# Altium PCB Catan_board.PcbDoc (part 2 of 3)
Units mm, origin at the board's own origin, x right, y up, seen from the top; angles counter-clockwise.
Board outline 80 x 59.64 mm, 2 copper layers (Top Layer, Bottom Layer), stack 1.448 mm thick; 132 components, 59 nets, 410 pads, 538 vias.
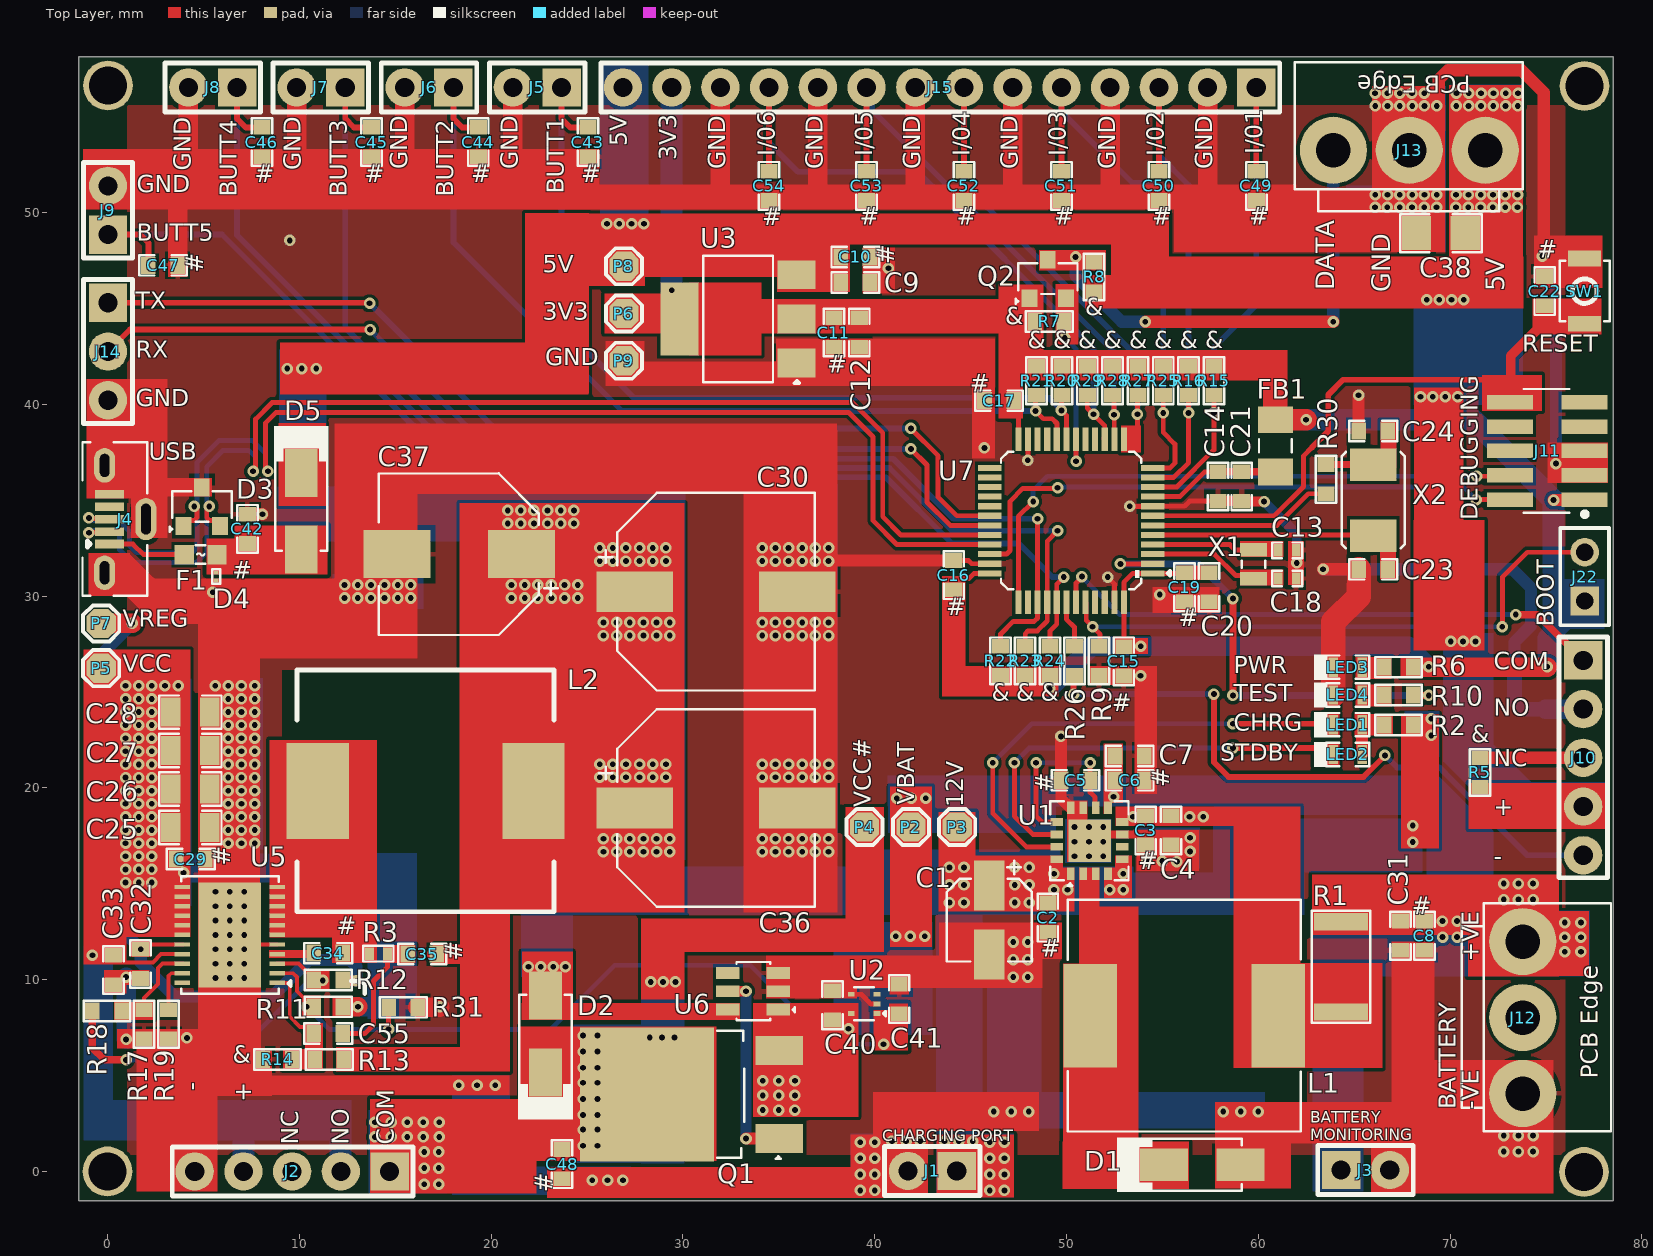
[diagram p0: Top Layer view]

## Part data (continued)
J11: "CONN HEADER SMD 10POS 1.27MM", Color=Black, Contact Resistance=30mR, Current Rating=1A, Insulation Resistance=100MR, LCSC Part Number=C150517, Manufacturer="Amphenol FCI", Max Operating Temperature=85°C, Max Voltage Rating (AC)=125V, Min Operating Temperature=-40°C, Package Quantity=600, Supplier Part Number 1=609-3695-6-ND, ComponentLink1Description=https://www.verical.com/server-webapp/html/getDatasheet?partID=177140&src-supplier=Verical, ComponentLink1URL=https://www.verical.com/server-webapp/html/getDatasheet?partID=177140&src-supplier=Verical, ComponentLink2Description=http://portal.fciconnect.com/Comergent/fci/drawing/20021121.pdf?src-supplier=Avnet, ComponentLink2URL=http://portal.fciconnect.com/Comergent/fci/drawing/20021121.pdf?src-supplier=Avnet, ComponentLink3Description=https://cdn.amphenol-icc.com/media/wysiwyg/files/drawing/20021121.pdf?src-supplier=Digi-Key, ComponentLink3URL=https://cdn.amphenol-icc.com/media/wysiwyg/files/drawing/20021121.pdf?src-supplier=Digi-Key, ComponentLink4Description=http://portal.fciconnect.com/Comergent/fci/drawing/20021121.pdf?src-supplier=Avnet+Europe, ComponentLink4URL=http://portal.fciconnect.com/Comergent/fci/drawing/20021121.pdf?src-supplier=Avnet+Europe, ComponentLink5Description=https://media.digikey.com/pdf/Data%20Sheets/FCI%20PDFs/Minitek%20127_Catalog.pdf?src-supplier=Digi-Key, ComponentLink5URL=https://media.digikey.com/pdf/Data%20Sheets/FCI%20PDFs/Minitek%20127_Catalog.pdf?src-supplier=Digi-Key, ComponentLink6Description=http://portal.fciconnect.com/Comergent//fci/drawing/20021121.pdf?src-supplier=Mouser, ComponentLink6URL=http://portal.fciconnect.com/Comergent//fci/drawing/20021121.pdf?src-supplier=Mouser, Connector Type="Male Pin,Header", Contact Material="Copper Alloy,Copper,Gold", Contact Mating Length=0.12inch, Contact Plating=Gold, Depth=3.4mm, Gender=Male, Housing Color=Black, Housing Material=Thermoplastic, Item Type="Jtag Header", Length=6.35mm, Manufacturer Part Number=20021121-00010C4LF, Mount="Surface Mount", Number of Contacts=10, Number of Positions=10, Number of Rows=2, Orientation=Straight, Packaging="Tape and Reel", Pitch=1.27mm, Pricing 1="1=0.87, 10=0.761, 100=0.6563 (USD)", Radiation Hardening=No, REACH SVHC="No SVHC", Row Spacing=0.05inch, Stack Height=3mm, Stock 1=0, Supplier 1=Digi-Key, Termination=Solder, Voltage Rating=125V
J12: library part B3P-VH(LF)(SN), "1x3P VH 1 3.96mm 3 Brass Plugin,P=3.96mm Wire To Board / Wire To Wire Connector ROHS", LCSC Part Number=C160316, Manufacture="JST Sales America", ComponentLink1Description=LCSC, ComponentLink1URL=https://www.lcsc.com/product-detail/Wire-To-Board-Wire-To-Wire-Connector_JST-Sales-America-B3P-VH-LF-SN_C160316.html, Item Type=Connector, Manufacture part number=B3P-VH(LF)(SN), Pakage=Plugin,P=3.96mm
J13: "1x3P VH 1 3.96mm 3 Brass Plugin,P=3.96mm Wire To Board / Wire To Wire Connector ROHS", LCSC Part Number=C160316, Manufacture="JST Sales America", ComponentLink1Description=LCSC, ComponentLink1URL=https://www.lcsc.com/product-detail/Wire-To-Board-Wire-To-Wire-Connector_JST-Sales-America-B3P-VH-LF-SN_C160316.html, Item Type=Connector, Manufacture part number=B3P-VH(LF)(SN), Pakage=Plugin,P=3.96mm
J14: library part "3P Through Hole Pads", "Wire Connecting Pads", Item Type="Through Hole Pads", Manufacturer Part Number="3P Through Hole Pads"
J15: library part "14P Through Hole Pads", "Wire Connecting Pads", Item Type="Through Hole Pads", Manufacturer Part Number="14P Through Hole Pads"
J22: "KK 254 Breakaway Header, Vertical, 2 Circuits, Tin (Sn) Plating, Mating Pin Length 6.09mm", Color=Black, Contact Resistance=20mR, Current Rating=4A, Flammability Rating="UL94 V-0", LCSC Part Number=C234182, Manufacturer=Molex, Manufacturer Part Number=22-28-4020, Max Operating Temperature=75°C, Max Voltage Rating (AC)=250V, Min Operating Temperature=0°C, Package Quantity=1, Supplier Part Number 1=8967620, Category="Headers and Wire Housings", ComponentLink1Description=https://datasheet.ciiva.com/1433/1596842-1433683.pdf?src-supplier=Element14, ComponentLink1URL=https://datasheet.ciiva.com/1433/1596842-1433683.pdf?src-supplier=Element14, ComponentLink2Description=https://datasheet.ciiva.com/5157/0022284020-pcb-headers-228358-5157523.pdf?src-supplier=Mouser, ComponentLink2URL=https://datasheet.ciiva.com/5157/0022284020-pcb-headers-228358-5157523.pdf?src-supplier=Mouser, ComponentLink3Description=https://datasheet.ciiva.com/30153/214440022284020-pcb-headers-30153261.pdf?src-supplier=Onlinecomponents.com, ComponentLink3URL=https://datasheet.ciiva.com/30153/214440022284020-pcb-headers-30153261.pdf?src-supplier=Onlinecomponents.com, ComponentLink4Description=https://datasheet.ciiva.com/15217/getdatasheetpartid-127875-15217702.pdf?src-supplier=Verical, ComponentLink4URL=https://datasheet.ciiva.com/15217/getdatasheetpartid-127875-15217702.pdf?src-supplier=Verical, ComponentLink5Description=https://datasheet.ciiva.com/10088/0022284020-pcb-headers-10088332.pdf?src-supplier=Avnet, ComponentLink5URL=https://datasheet.ciiva.com/10088/0022284020-pcb-headers-10088332.pdf?src-supplier=Avnet, Connector Type="Male Pin", Contact Material=Brass,Bronze, Contact Mating Length=0.24inch, Contact Plating=Tin, Contact Type="Male Pin", Depth=2.49mm, Gender=Male, Glow Wire Compliant=Non-compliant, Housing Color=Black, Housing Material=Nylon, Item Type=Header, Lead Free="Lead Free", Max Voltage Rating (DC)=250V, Mount="Through Hole", Number of Circuits=2, Number of Contacts=2, Number of Positions=2, Number of Rows=1, Orientation=Straight, Packaging=Bulk, Pitch=2.54mm, Pricing 1="50=0.06100, 150=0.05600, 250=0.05200, 500=0.04900 (GBP)", Radiation Hardening=No, RoHS=Yes, RoHS Compliant=Yes, Series="KK® 42375", Stock 1=29550, Supplier 1=Rs, Termination=Solder, Voltage Rating=250V, Voltage Rating (DC)=250V
L1: library part YPRH1204-220M, "2.9A 22uH ±20% 66mΩ SMD,12x12x5mm Power Inductors ROHS", LCSC Part Number=C338845, Manufacturer=YJYCOIN, Package=SMD,12x12x5mm, ComponentLink1Description=LCSC, ComponentLink1URL=https://www.lcsc.com/product-detail/Power-Inductors_YJYCOIN-YPRH1204-220M_C338845.html, Item Type=Inductor, Manufacturer Part Number=YPRH1204-220M
L2: library part BCIH1367-2R2M, "22A 2.2uH ±20% SMD Power Inductors ROHS", LCSC Part Number=C237973, Manufacturer="BC(Bao Cheng Elec)", Package=SMD, ComponentLink1Description=LCSC, ComponentLink1URL=https://www.lcsc.com/product-detail/Power-Inductors_BC-Bao-Cheng-Elec-BCIH1367-2R2M_C237973.html, Item Type=Inductor, Manufacturer Part Number=BCIH1367-2R2M
LED1: library part NCD0603G2, "Emerald 0603 Light Emitting Diodes (LED) ROHS", LCSC Part Number=C87326, Manufacturer="Foshan NationStar Optoelectronics", Package=0603, ComponentLink1Description=LCSC, ComponentLink1URL=https://www.lcsc.com/product-detail/Light-Emitting-Diodes-LED_Foshan-NationStar-Optoelectronics-NCD0603G2_C87326.html, Item Type=LED, Manufacturer Part Number=NCD0603G2
LED2 LED3 LED4: library part NCD0603R3, "0603 Light Emitting Diodes (LED) ROHS", LCSC Part Number=C3151730, Manufacturer="Foshan NationStar Optoelectronics", Package=0603, ComponentLink1Description=LCSC, ComponentLink1URL=https://www.lcsc.com/product-detail/Light-Emitting-Diodes-LED_Foshan-NationStar-Optoelectronics-NCD0603R3_C3151730.html, Item Type=LED, Manufacturer Part Number=NCD0603R3
P2 P3 P4 P5 P6 P7 P8 P9: "Test Point ON"
Q1: "30V 20A 29W 39mΩ@10V,15A 2.5V@250uA P Channel 1345pF@15V TO-252-2L MOSFETs ROHS", LCSC Part Number=C4748750, Manufacturer="HXY MOSFET", Package=TO-252-2L, ComponentLink1Description=LCSC, ComponentLink1URL=https://www.lcsc.com/product-detail/MOSFETs_HXY-MOSFET-20P03-HXY_C4748750.html, Item Type=Mosfet, Manufacturer Part Number=20P03-HXY
Q2: "50V 220mA 3.5Ω@10V,220mA 225mW 1.6V@1mA N Channel SOT-23 MOSFETs ROHS", LCSC Part Number=C426569, Manufacturer="Slkor(SLKORMICRO Elec.)", Package=SOT-23, ComponentLink1Description=LCSC, ComponentLink1URL=https://www.lcsc.com/product-detail/MOSFETs_Slkor-SLKORMICRO-Elec-BSS138_C426569.html, Item Type=Mosfet, Manufacturer Part Number=BSS138
R1: library part WSL2010R0500FEA, "RES 0.05 OHM 1% 1/2W 2010", Case Code (Imperial)=2010, Case Code (Metric)=5025, LCSC Part Number=C844689, Manufacturer="Vishay Dale", Max Operating Temperature=170°C, Max Power Dissipation=500mW, Min Operating Temperature=-65°C, Package Quantity=1, Resistance=50mR, Resistor Type="Metal Element,Metal Strip", Supplier Part Number 1=WSLE-.05CT-ND, Temperature Coefficient=75ppm/°C, Tolerance=1%, Voltage Rating=150mV, Case/Package=2010, Category="Chip SMD Resistors", ComponentLink1Description=https://datasheet.ciiva.com/2483/wsl-2483729.pdf?src-supplier=Digi-Key, ComponentLink1URL=https://datasheet.ciiva.com/2483/wsl-2483729.pdf?src-supplier=Digi-Key, ComponentLink2Description=https://datasheet.ciiva.com/2483/wsl-2483730.pdf?src-supplier=Digi-Key, ComponentLink2URL=https://datasheet.ciiva.com/2483/wsl-2483730.pdf?src-supplier=Digi-Key, ComponentLink3Description=https://datasheet.ciiva.com/2483/wsl-2483731.pdf?src-supplier=Digi-Key, ComponentLink3URL=https://datasheet.ciiva.com/2483/wsl-2483731.pdf?src-supplier=Digi-Key, ComponentLink4Description=https://datasheet.ciiva.com/7695/wsl-7695158.pdf?src-supplier=Element14, ComponentLink4URL=https://datasheet.ciiva.com/7695/wsl-7695158.pdf?src-supplier=Element14, ComponentLink5Description=https://datasheet.ciiva.com/16215/wsl-16215947.pdf?src-supplier=Future+Electronics, ComponentLink5URL=https://datasheet.ciiva.com/16215/wsl-16215947.pdf?src-supplier=Future+Electronics, ComponentLink6Description=https://datasheet.ciiva.com/17177/wsl-17177243.pdf?src-supplier=Avnet+Europe, ComponentLink6URL=https://datasheet.ciiva.com/17177/wsl-17177243.pdf?src-supplier=Avnet+Europe, ComponentLink7Description=https://datasheet.ciiva.com/28621/1911169-28621837.pdf?src-supplier=Element14, ComponentLink7URL=https://datasheet.ciiva.com/28621/1911169-28621837.pdf?src-supplier=Element14, ComponentLink8Description=https://datasheet.ciiva.com/36857/442550-36857725.pdf?src-supplier=Element14, ComponentLink8URL=https://datasheet.ciiva.com/36857/442550-36857725.pdf?src-supplier=Element14, Contact Plating=Tin,Matte, Depth=2.54mm, Features="Moisture Resistant", Height=0.635mm, Item Type=Resistor, Lead Free="Lead Free", Length=5.08mm, Manufacturer Part Number=WSL2010R0500FEA, Military Standard=Not, Mount="Surface Mount", Number of Pins=2, Number of Terminations=2, Packaging="Tape and Reel", Power Rating=500mW, Pricing 1="1=0.92000, 10=0.81400, 25=0.74800, 50=0.68240, 100=0.59060, 250=0.49876, 500=0.42000, 1000=0.35000 (USD)", Radiation Hardening=No, REACH SVHC="No SVHC", RoHS=No, Stock 1=20000, Supplier 1=Digi-Key, Termination=SMD/SMT, Weight=0.001372oz, Width=0.1inch
R2 R6 R10: library part RT0603DRD071KL, "RES SMD 1K OHM 0.5% 1/10W 0603", Case Code (Imperial)=0603, Case Code (Metric)=1608, LCSC Part Number=C165964, Manufacturer=Yageo, Max Operating Temperature=125°C, Min Operating Temperature=-55°C, Power Rating=100mW, Resistance=1kR, Supplier Part Number 1=311-1.0KDDKR-ND, Temperature Coefficient=25ppm/°C, Tolerance=0.5%, Voltage Rating=75V, Voltage Rating (DC)=50V, Case/Package=0603, ComponentLink1Description=http://www.mouser.com/ds/2/447/yageodocoutput-1125656.pdf?src-supplier=Mouser, ComponentLink1URL=http://www.mouser.com/ds/2/447/yageodocoutput-1125656.pdf?src-supplier=Mouser, ComponentLink2Description=http://www.yageo.com/documents/recent/PYu-RT_1-to-0.05_RoHS_L_6.pdf?src-supplier=Avnet, ComponentLink2URL=http://www.yageo.com/documents/recent/PYu-RT_1-to-0.05_RoHS_L_6.pdf?src-supplier=Avnet, Composition="Thin Film", Contact Plating=Tin,Matte, Lead Free="Lead Free", Manufacturer Part Number=RT0603DRD071KL, Packaging="Tape and Reel", Pricing 1="1=0.2, 10=0.167, 100=0.0651, 1000=0.02725, 2500=0.02498 (USD)", Radiation Hardening=No, Stock 1=178947, Supplier 1=Digi-Key, Termination=SMD/SMT
R3: library part WR04X1541FTL, "62.5mW Thick Film Resistors ±1% 1.54kΩ 0402 Chip Resistor - Surface Mount ROHS", LCSC Part Number=C396136, Manufacturer="Walsin Tech Corp", Package=0402, ComponentLink1Description=LCSC, ComponentLink1URL=https://www.lcsc.com/product-detail/Chip-Resistor-Surface-Mount_Walsin-Tech-Corp-WR04X1541FTL_C396136.html, Item Type=Resistor, Manufacturer Part Number=WR04X1541FTL
R5 R7 R8 R14 R15 R16 R20 R21 R22 R23 R24 R25 R27 R28 R29: library part AC0603JR-0710KL, "RES SMD 10K OHM 5% 1/10W 0603", Case Code (Imperial)=0603, Case Code (Metric)=1608, LCSC Part Number=C140867, Manufacturer=Yageo, Max Operating Temperature=155°C, Max Power Dissipation=100mW, Min Operating Temperature=-55°C, Package Quantity=1, Resistance=10kR, Resistor Type="Thick Film", Supplier Part Number 1=1029044, Temperature Coefficient=100ppm/°C, Tolerance=5%, Voltage Rating=50V, Case/Package=0603, Category="Chip SMD Resistors", ComponentLink1Description=https://datasheet.ciiva.com/5562/pyu-ac-51-rohs-l-2-5562553.pdf?src-supplier=Mouser, ComponentLink1URL=https://datasheet.ciiva.com/5562/pyu-ac-51-rohs-l-2-5562553.pdf?src-supplier=Mouser, Construction=Rectangular, Depth=0.8mm, Features="Moisture Resistant,Automotive AEC-Q200,Anti-Sulfur", Height=0.022inch, Item Type=Resistor, Lead Free="Lead Free", Length=0.063inch, Manufacturer Part Number=AC0603JR-0710KL, Military Standard=Not, Number of Terminations=2, Packaging="Tape and Reel", Power Rating=100mW, Pricing 1="5000=0.00540 (USD)", RoHS=Yes, RoHS Compliant=Yes, Series=AC, Size Code=0603, Stock 1=1533000, Supplier 1="Future Electronics", Termination=SMD/SMT, Width=0.031inch
R9: library part RT0603BRD0733KL, "RES SMD 33K OHM 0.1% 1/10W 0603", Case Code (Imperial)=0603, Case Code (Metric)=1608, LCSC Part Number=C705768, Manufacturer=Yageo, Max Operating Temperature=125°C, Max Power Dissipation=100mW, Min Operating Temperature=-55°C, Package Quantity=5000, Resistance=33kR, Resistor Type="Thin Film", Temperature Coefficient=25ppm/°C, Voltage Rating=75V, Voltage Rating (DC)=50V, Case/Package=0603, Category="Chip SMD Resistors", ComponentLink1Description=https://datasheet.ciiva.com/2585/pyu-rt-1-to-0-05-rohs-l-4-2585891.pdf?src-supplier=Digi-Key, ComponentLink1URL=https://datasheet.ciiva.com/2585/pyu-rt-1-to-0-05-rohs-l-4-2585891.pdf?src-supplier=Digi-Key, ComponentLink2Description=https://datasheet.ciiva.com/12810/pyu-rt-1-to-0-05-rohs-l-4-12810117.pdf?src-supplier=Mouser, ComponentLink2URL=https://datasheet.ciiva.com/12810/pyu-rt-1-to-0-05-rohs-l-4-12810117.pdf?src-supplier=Mouser, ComponentLink3Description=https://datasheet.ciiva.com/8889/pyu-rt-1-to-0-05-rohs-l-4-8889590.pdf?src-supplier=Avnet, ComponentLink3URL=https://datasheet.ciiva.com/8889/pyu-rt-1-to-0-05-rohs-l-4-8889590.pdf?src-supplier=Avnet, Construction=Rectangular, Contact Plating=Tin,Matte, Depth=0.8mm, Features="Moisture Resistant", Height=0.022inch, Lead Free="Lead Free", Length=1.6mm, Manufacturer Part Number=RT0603BRD0733KL, Military Standard=Not, Number of Terminations=2, Packaging="Tape and Reel", Power Rating=100mW, Pricing 1="1=0.30860 (USD)", Radiation Hardening=No, RoHS=Yes, RoHS Compliant=Yes, Series=RT, Size Code=0603, Stock 1=2, Supplier 1="Arrow Electronics", Supplier Part Number 1=RT0603BRD0733KL, Termination=SMD/SMT, Weight=7.1E-05oz, Width=0.031inch
R11 R12: library part RC0603JR-07100KL, "RES 100K OHM 5% 1/10W 0603", Case Code (Imperial)=0603, Case Code (Metric)=1608, LCSC Part Number=C100048, Manufacturer=Yageo, Max Operating Temperature=155°C, Max Power Dissipation=100mW, Min Operating Temperature=-55°C, Resistance=100kR, Resistance Tolerance=5%, Resistor Type="Thick Film", Supplier Part Number 1=311-100KGRCT-ND, Temperature Coefficient=100ppm/°C, Voltage Rating=50V, Case/Package=0603, Category="Chip SMD Resistors", ComponentLink1Description=https://datasheet.ciiva.com/7746/443971-7746424.pdf?src-supplier=Element14, ComponentLink1URL=https://datasheet.ciiva.com/7746/443971-7746424.pdf?src-supplier=Element14, ComponentLink2Description=https://datasheet.ciiva.com/7983/443971-7983686.pdf?src-supplier=Element14, ComponentLink2URL=https://datasheet.ciiva.com/7983/443971-7983686.pdf?src-supplier=Element14, ComponentLink3Description=https://datasheet.ciiva.com/7746/443971-7746423.pdf?src-supplier=Element14, ComponentLink3URL=https://datasheet.ciiva.com/7746/443971-7746423.pdf?src-supplier=Element14, ComponentLink4Description=https://datasheet.ciiva.com/8887/pyu-rc0603-51-rohs-l-4-8887903.pdf?src-supplier=Avnet, ComponentLink4URL=https://datasheet.ciiva.com/8887/pyu-rc0603-51-rohs-l-4-8887903.pdf?src-supplier=Avnet, Contact Plating=Tin,Matte, Features="Moisture Resistant", Lead Free="Lead Free", Manufacturer Part Number=RC0603JR-07100KL, Number of Pins=2, Number of Terminations=2, Packaging="Tape and Reel", Power Rating=100mW, Pricing 1="1=0.10000, 10=0.02000, 100=0.00800, 1000=0.00360, 2500=0.00312 (USD)", Radiation Hardening=No, REACH SVHC="No SVHC", RoHS=Yes, RoHS Compliant=Yes, Series=RC, Size Code=0603, Stock 1=1210037, Supplier 1=Digi-Key, Termination=SMD/SMT, Tolerance=5%, Voltage Rating (DC)=50V, Width=0.8mm
R13: library part RC0603FR-0773K2L, "RES 73.2K OHM 1% 1/10W 0603", Case Code (Imperial)=0603, Case Code (Metric)=1608, LCSC Part Number=C163420, Manufacturer=Yageo, Max Operating Temperature=155°C, Max Power Dissipation=100mW, Min Operating Temperature=-55°C, Resistor Type="Thick Film", Supplier Part Number 1=8036170, Temperature Coefficient=100ppm/°C, Tolerance=1%, Voltage Rating=50V, Case/Package=0603, Category="Chip SMD Resistors", ComponentLink1Description=https://datasheet.ciiva.com/8888/pyu-rc0603-51-rohs-l-4-8888325.pdf?src-supplier=Avnet, ComponentLink1URL=https://datasheet.ciiva.com/8888/pyu-rc0603-51-rohs-l-4-8888325.pdf?src-supplier=Avnet, Construction=Rectangular, Contact Plating=Tin,Matte, Depth=0.8mm, Features="Moisture Resistant", Height=0.45mm, Item Type=Resistor, Lead Free="Lead Free", Length=1.6mm, Manufacturer Part Number=RC0603FR-0773K2L, Military Standard=Not, Number of Terminations=2, Packaging="Tape and Reel", Power Rating=100mW, Pricing 1="5000=0.00150, 75000=0.00140, 250000=0.00130, 750000=0.00130, 2500000=0.00120 (USD)", RoHS=Yes, RoHS Compliant=Yes, Series=RC, Stock 1=410000, Supplier 1="Future Electronics", Termination=SMD/SMT, Voltage Rating (DC)=50V, Width=0.8mm
R17 R18: library part RC0603FR-07200KL, "RES SMD 200K OHM 1% 1/10W 0603", LCSC Part Number=C105574, Manufacturer=Yageo, Package=0603, ComponentLink3Description=LCSC, ComponentLink3URL=https://www.lcsc.com/product-detail/Chip-Resistor-Surface-Mount_YAGEO-RC0603FR-07200KL_C105574.html, Item Type=Resistor, Manufacturer Part Number=RC0603FR-07200KL
R19: library part RT0603DRD07147KL, "RES SMD 147K OHM 0.5% 1/10W 0603", Case Code (Imperial)=0603, Case Code (Metric)=1608, LCSC Part Number=C728612, Manufacturer=Yageo, Max Operating Temperature=155°C, Max Power Dissipation=100mW, Min Operating Temperature=-55°C, Package Quantity=10, Supplier Part Number 1=603-RT0603DRD07147KL, Temperature Coefficient=25ppm/°C, Tolerance=0.5%, Voltage Rating (DC)=50V, Case/Package=0603, Category="Chip SMD Resistors", ComponentLink1Description=http://www.yageo.com/documents/recent/PYu-RT_1-to-0.01_RoHS_L_9.pdf?src-supplier=Digi-Key, ComponentLink1URL=http://www.yageo.com/documents/recent/PYu-RT_1-to-0.01_RoHS_L_9.pdf?src-supplier=Digi-Key, Height=0.45mm, Item Type=Resistor, Lead Free="Lead Free", Length=1.6mm, Manufacturer Part Number=RT0603DRD07147KL, Number of Terminations=2, Packaging="Tape and Reel", Power Rating=100mW, Pricing 1="1=0.18000, 10=0.14700, 50=0.14700, 100=0.05600, 1000=0.02400, 10000=0.01800 (USD)", RoHS=Yes, RoHS Compliant=Yes, Series=RT, Stock 1=1848, Supplier 1=Mouser, Width=0.8mm
R26: library part RT0603DRD07200RL, "RES SMD 200 OHM 0.5% 1/10W 0603", Case/Package=0603, LCSC Part Number=C700498, Manufacturer=Yageo, Power Rating=100mW, Supplier Part Number 1=311-200DCT-ND, Tolerance=0.5%, Voltage Rating (DC)=50V, Lead Free="Lead Free", Manufacturer Part Number=RT0603DRD07200RL, Packaging="Cut Tape", Pricing 1="1=0.21, 10=0.174, 100=0.0682, 1000=0.02855, 2500=0.02617 (USD)", Resistance=200R, Stock 1=19572, Supplier 1=Digi-Key
R30: library part RC0603JR-07390RL, "RES SMD 390 OHM 5% 1/10W 0603", LCSC Part Number=C137632, Manufacturer=Yageo, Package=0603, ComponentLink4Description=LCSC, ComponentLink4URL=https://www.lcsc.com/product-detail/Chip-Resistor-Surface-Mount_YAGEO-RC0603JR-07390RL_C137632.html, Item Type=Resistor, Manufacturer Part Number=RC0603JR-07390RL
R31: library part PNM0603E5002BST5, "RES SMD 50K OHM 0.1% 0.15W 0603", Case Code (Imperial)=0603, Case Code (Metric)=1608, LCSC Part Number=C2073717, Manufacturer="Vishay Dale Thin Film", Max Operating Temperature=125°C, Min Operating Temperature=-55°C, Power Rating=150mW, Resistance=50kR, Supplier Part Number 1=PNM0603-50KBDKR-ND, Temperature Coefficient=25ppm/°C, Tolerance=0.1%, Voltage Rating=75V, Case/Package=0603, ComponentLink1Description=LCSC, ComponentLink1URL=https://www.lcsc.com/product-detail/Chip-Resistor-Surface-Mount_Vishay-Intertech-PNM0603E5002BST5_C2073717.html, Composition="Thin Film", Contact Plating=Copper,Tin,Silver, Height=0.02inch, Length=0.064inch, Manufacturer Part Number=PNM0603E5002BST5, Packaging="Tape and Reel", Pricing 1="1=3.07, 10=2.743, 100=2.0299 (USD)", Radiation Hardening=No, REACH SVHC=Unknown, Stock 1=16518, Supplier 1=Digi-Key, Termination=SMD/SMT, Voltage Rating (DC)=75V, Width=0.032inch
SW1: "SWITCH TACTILE SPST-NO 0.05A 12V", Contact Current Rating=50mA, Contact Resistance=100mR, Insulation Resistance=100MR, LCSC Part Number=C231329, Manufacturer=Omron, Max Operating Temperature=70°C, Max Voltage Rating (DC)=12V, Min Operating Temperature=-25°C, Operating Force=1.5N, Package Quantity=1, Ratings="Dust Proof,IP40", Supplier Part Number 1=SW1020DKR-ND, Actuator Length=0.4mm, Actuator Type=Standard, ComponentLink1Description=http://www.farnell.com/datasheets/60838.pdf?src-supplier=Farnell, ComponentLink1URL=http://www.farnell.com/datasheets/60838.pdf?src-supplier=Farnell, ComponentLink2Description=http://www.farnell.com/datasheets/60838.pdf?src-supplier=Element14, ComponentLink2URL=http://www.farnell.com/datasheets/60838.pdf?src-supplier=Element14, ComponentLink3Description=https://omronfs.omron.com/en_US/ecb/products/pdf/en-b3u.pdf?src-supplier=Digi-Key, ComponentLink3URL=https://omronfs.omron.com/en_US/ecb/products/pdf/en-b3u.pdf?src-supplier=Digi-Key, ComponentLink4Description=http://www.omron.com/ecb/products/pdf/en-b3u.pdf?src-supplier=Digi-Key, ComponentLink4URL=http://www.omron.com/ecb/products/pdf/en-b3u.pdf?src-supplier=Digi-Key, ComponentLink5Description=https://www.distrelec.biz/Web/Downloads/he/et/B3U_eng_datasheet.pdf?mime=application%2Fpdf&src-supplier=Distrelec, ComponentLink5URL=https://www.distrelec.biz/Web/Downloads/he/et/B3U_eng_datasheet.pdf?mime=application%2Fpdf&src-supplier=Distrelec, ComponentLink6Description=http://www.onlinecomponents.com/productFiles/mf-OM/en-b3u.pdf?src-supplier=Onlinecomponents.com, ComponentLink6URL=http://www.onlinecomponents.com/productFiles/mf-OM/en-b3u.pdf?src-supplier=Onlinecomponents.com, ComponentLink7Description=https://www.verical.com/server-webapp/html/getDatasheet?partID=552554&src-supplier=Verical, ComponentLink7URL=https://www.verical.com/server-webapp/html/getDatasheet?partID=552554&src-supplier=Verical, ComponentLink8Description=http://www.farnell.com/datasheets/1685550.pdf?src-supplier=Element14, ComponentLink8URL=http://www.farnell.com/datasheets/1685550.pdf?src-supplier=Element14, ComponentLink9Description=http://www.farnell.com/datasheets/2610940.pdf?src-supplier=Farnell, ComponentLink9URL=http://www.farnell.com/datasheets/2610940.pdf?src-supplier=Farnell, ComponentLink10Description=https://www.alliedelec.com/m/d/4c8a9ef82804fc3c241a13c1e298fd73.pdf?src-supplier=Allied+Electronics, ComponentLink10URL=https://www.alliedelec.com/m/d/4c8a9ef82804fc3c241a13c1e298fd73.pdf?src-supplier=Allied+Electronics, Contact Material=Silver, Current Rating=50mA, Depth=2.5mm, Electrical Life=200000Cycles, Height=1.2mm, Illumination Type=Non-Illuminated,Illuminated, Item Type=Switch, Lead Free="Lead Free", Length=4mm, Manufacturer Part Number=B3U-1000P, Max Current Rating=50mA, Mechanical Life=200000Cycles, Mount="Surface Mount", Orientation=Straight, Packaging="Tape and Reel", Pricing 1="1=1, 10=0.961, 25=0.9064, 50=0.7976, 100=0.7251, 250=0.68888, 500=0.67074, 1000=0.52571 (USD)", REACH SVHC=Unknown, Stock 1=116454, Supplier 1=Digi-Key, Switch Function=Off-Mom, Switch Travel=0.15mm, Termination=SMD/SMT, Throw Configuration=SPST, Voltage Rating (DC)=12V, Weight=0.000776oz, Width=3mm
U1: "TQFN-16-EP(4x4) Battery Management ICs ROHS", LCSC Part Number=C379389, Manufacturer="TOPPOWER(Nanjing Extension Microelectronics)", Package=TQFN-16-EP(4x4), ComponentLink1Description=LCSC, ComponentLink1URL=https://www.lcsc.com/product-detail/Battery-Management-ICs_TOPPOWER-Nanjing-Extension-Microelectronics-TP5100_C379389.html, Item Type=IC, Manufacturer Part Number=TP5100
U2: "IC SUPERVISOR 1 CHANNEL 5VSOF", Case/Package=VSOF, LCSC Part Number=C509824, Manufacturer=Rohm, Max Operating Temperature=105°C, Max Power Dissipation=210mW, Max Reset Threshold Voltage=6.09V, Max Supply Current=1.98uA, Max Supply Voltage=10V, Min Operating Temperature=-40°C, Min Reset Threshold Voltage=5.91V, Min Supply Voltage=1.2V, Number of Voltages Monitored=1, Operating Supply Current=900nA, Package Quantity=3000, Supplier Part Number 1=BD4860FVE-CT-ND, Threshold Voltage=6V, Accuracy=1%, Category="Voltage Supervisors", ComponentLink1Description=https://datasheet.ciiva.com/1974/bd48xxg-e-1974994.pdf?src-supplier=Digi-Key, ComponentLink1URL=https://datasheet.ciiva.com/1974/bd48xxg-e-1974994.pdf?src-supplier=Digi-Key, ComponentLink2Description=https://datasheet.ciiva.com/8133/bd48xxg-e-8133113.pdf?src-supplier=Avnet, ComponentLink2URL=https://datasheet.ciiva.com/8133/bd48xxg-e-8133113.pdf?src-supplier=Avnet, Item Type=IC, Lead Free="Lead Free", Manufacturer Part Number=BD4860FVE-TR, Mounting Technology="Surface Mount", Number of Monitored Inputs=1, Packaging="Tape and Reel", Pins=5, Pricing 1="1=0.64000, 10=0.54900, 25=0.51200, 100=0.40960, 250=0.38032, 500=0.32182, 1000=0.24868 (USD)", Reset="Active Low", RoHS=Yes, RoHS Compliant=Yes, Series=BD48xxx, Stock 1=5990, Supplier 1=Digi-Key, Type="Simple Reset/Power-On Reset,Voltage Detector", Watchdog Timer=No
U3: "15V 1.3V @ 800mA Fixed 3.3V SOT-223 Linear Voltage Regulators (LDO) ROHS", LCSC Part Number=C92102, Manufacturer="Diodes Incorporated", Package=SOT-223, Item Type=IC, Manufacturer Part Number=AZ1117CH-3.3TRG1
U5: "IC REG BUCK ADJUSTABLE 14A 22SON", Case/Package=SON, LCSC Part Number=C181971, Manufacturer="Texas Instruments", Max Input Voltage=22V, Max Operating Temperature=85°C, Max Output current=14A, Max Output Voltage=5.5V, Min Input Voltage=1.5V, Min Operating Temperature=-40°C, Min Output Voltage=600mV, Package Quantity=2500, Quiescent Current=320uA, Switching Frequency=1MHz, Category="Voltage Regulators - Switching", ComponentLink1Description=https://datasheet.ciiva.com/6605/tps53318-6605682.pdf?src-supplier=Digi-Key, ComponentLink1URL=https://datasheet.ciiva.com/6605/tps53318-6605682.pdf?src-supplier=Digi-Key, ComponentLink2Description=LCSC, ComponentLink2URL=https://www.lcsc.com/product-detail/DC-DC-Converters_Texas-Instruments-TPS53319DQPR_C181971.html, Contact Plating=Gold, Efficiency=91%, Item Type=IC, Lead Free="Contains Lead", Manufacturer Part Number=TPS53319DQPR, Mount="Surface Mount", Number of Outputs=1, Number of Pins=22, Output Configuration=Positive, Output Current=14A, Output Type=Adjustable, Output Voltage=5.5V, Packaging="Tape and Reel", Radiation Hardening=No, RoHS=Yes, RoHS Compliant=Yes, Series="D-CAP™, Eco-Mode™", Supplier 1=Newark, Synchronous Rectifier=Yes
U6: "IC OR CTRLR SRC SELECT TSOT23-6", Case/Package=SOT-23-6, LCSC Part Number=C521306, Manufacturer="Analog Devices / Linear Technology", Max Operating Temperature=85°C, Min Operating Temperature=-40°C, Operating Supply Current=15uA, Package Quantity=2500, Supplier Part Number 1=LTC4412IS6#TRPBFCT-ND, Category=Uncategorized, ComponentLink1Description=https://datasheet.ciiva.com/1960/1527-1960891.pdf?src-supplier=Digi-Key, ComponentLink1URL=https://datasheet.ciiva.com/1960/1527-1960891.pdf?src-supplier=Digi-Key, Item Type=IC, Length=2.9mm, Manufacturer Part Number=LTC4412IS6#TRPBF, Number of Pins=6, Packaging="Tape and Reel", Pricing 1="1=3.90000, 10=3.50700, 25=3.31520, 100=2.87310, 250=2.72580, 500=2.44584, 1000=2.08500 (USD)", RoHS=Yes, RoHS Compliant=Yes, Series=PowerPath™, Stock 1=2608, Supplier 1=Digi-Key, Turn-Off Delay Time=13us, Turn-On Delay Time=110us
U7: "IC MCU 32BIT 128KB FLASH 48LQFP", Case/Package=LQFP, Frequency=48MHz, LCSC Part Number=C2053863, Manufacturer=STMicroelectronics, Max Operating Temperature=85°C, Min Operating Temperature=-40°C, Supplier Part Number 1=497-18745-6-ND, Category=Microcontrollers, ComponentLink1Description=http://www.mouser.com/ds/2/389/stm32f070c6-956182.pdf?src-supplier=Mouser, ComponentLink1URL=http://www.mouser.com/ds/2/389/stm32f070c6-956182.pdf?src-supplier=Mouser, ComponentLink2Description=http://www.st.com/content/ccc/resource/technical/document/datasheet/31/4f/10/5f/a5/32/46/42/DM00141386.pdf/files/DM00141386.pdf/jcr:content/translations/en.DM00141386.pdf?src-supplier=Digi-Key, ComponentLink2URL=http://www.st.com/content/ccc/resource/technical/document/datasheet/31/4f/10/5f/a5/32/46/42/DM00141386.pdf/files/DM00141386.pdf/jcr:content/translations/en.DM00141386.pdf?src-supplier=Digi-Key, Core Architecture=ARM, Interface=I2C,SPI,USB,UART,USART, Item Type=IC, Lead Free="Lead Free", Manufacturer Part Number=STM32F070CBT6TR, Memory Size=128KB, Memory Type=FLASH, Number of I/Os=37, Oscillator Type=Internal, Packaging="Tape and Reel", Peripherals=POR,PWM,WDT,DMA, Pricing 1="1=3.40000, 10=3.05100, 25=2.87800, 100=2.45200, 250=2.30232, 500=2.01452, 1000=1.91860 (USD)", RoHS=Yes, RoHS Compliant=Yes, Supplier 1=Digi-Key
X1: library part FC-12M32.768KHZ7PF20PPM, "CRYSTAL 32.7680KHZ 9PF SMD", LCSC Part Number=C99009, Manufacturer="Seiko Epson", Package=SMD2012-2P, ComponentLink1Description=LCSC, ComponentLink1URL=https://www.lcsc.com/product-detail/Crystals_Seiko-Epson-FC-12M32-768KHZ7PF20PPM_C99009.html, Item Type=Crystal, Manufacturer Part Number=FC-12M32.768KHZ7PF20PPM
X2: library part X50328MSB2GI, "8MHz 20pF ±10ppm ±50ppm SMD5032-2P Crystals ROHS", LCSC Part Number=C115962, Manufacturer="Yangxing Tech", Package=SMD5032-2P, ComponentLink1Description=LCSC, ComponentLink1URL=https://www.lcsc.com/product-detail/Crystals_Yangxing-Tech-X50328MSB2GI_C115962.html, Item Type=Crystal, Manufacturer Part Number=X50328MSB2GI

## Free pads (board coordinates)
  round 2.6 hole 2 unplated mask+0.05: MH(0,0) MH(0.025,56.617) MH(76.977,-0.025) MH(77.003,56.591)

## Via types
v1: diameter 0.6, hole 0.3, Top Layer to Bottom Layer, 536 vias
v2: diameter 0.6, hole 0.3, Top Layer to Bottom Layer, tented both sides, 2 vias

## Nets (pads, with @x,y where several pads share a name; then routed paths per layer and width w, separated by ;. In a path a pad name is that pad's centre, name@x,y a point inside that pad or via, vN(x,y) a via of type N, cw(c..) or ccw(c..) an arc to the next point about the centre after c; other vN are vias at no path point)
3V3: C11.2 C12.2 C15.2 C16.2 C17.2 C19.2 C20.2 FB1.1 J11.1 J15.13 J22.1 P6.1 Q2.1 R6.2 R7.1 R15.1 R16.1 R20.2 R21.2 R22.2 R23.2 R24.2 R25.1 R27.1 R28.1 R29.1 U3.2 U3.4 U7.1 U7.24 U7.36 U7.48 | length 84.4
  Top Layer w0.254: C16.2@43.84,30.328 C16.2@44.12,30.328 44.12,30.505 44.526,30.912 44.907,30.912 45.18,31.184 U7.36@45.991,31.184 ; C17.2@47.244,40.183 47.219,40.157 47.491,39.885 U7.24@47.491,38.184 ; C15.2@52.991,27.363 U7.48@52.991,29.684 52.991,30.715 53.46,31.184 U7.1@54.491,31.184 57.397,31.184 C20.2@57.429,31.217 C20.2@57.633,31.217
  Top Layer w0.635: v1(49.124,25.171) 49.124,25.852 R24.2@49.129,25.857 ; C15.2@52.984,27.356 52.991,27.363 C15.2@53.004,27.375 ; v1@53.867,27.375 v1(53.873,27.381) ; v1(75.387,35.001) 76.987,35.001 J11.1@77.013,35.027
  Top Layer w1.016: FB1.1@60.884,39.194 FB1.1@60.886,39.192 ; R6.2@68.072,26.289 v1@75.057,26.289
  Top Layer w1.143: FB1.1@60.886,39.192 v1(62.484,39.192)
  Top Layer w1.27: FB1.1@60.884,39.194 60.884,41.173
  Bottom Layer w0.635: 75.416,29.07 76.013,29.667 76.276,29.667 76.352,29.743 J22.1@76.429,29.82
  Bottom Layer w1.016: v1(49.124,25.171) 51.333,27.381 v1(53.873,27.381) 67.818,27.381 v1(68.885,26.314) ; v1(75.057,26.314) 75.057,27.788 J22.1@77.013,29.743
  Bottom Layer w1.143: v1(29.413,45.949) J15.13@29.413,56.515 ; v1(62.484,39.192) 71.196,39.192 v1(75.387,35.001) 75.387,30.15 75.794,29.743 76.352,29.743 J22.1@77.013,29.743
5V_USB: C42.2 D4.1 D5.2 F1.2
12V: C1.1 C2.2 D2.2 J1.1 P3.1 R2.1 U1.1 U1.4 U1.5 U1.16 U6.6 | length 4.3
  Top Layer w0.254: R2.1@68.047,23.241 R2.1@68.072,23.266
  Top Layer w0.559: D2.2@22.962,9.163 22.962,9.019 D2.2@23.532,8.448
  Top Layer w1.016: v1@22.555,10.897 22.62,10.832 22.62,9.905 22.962,9.563 D2.2@22.962,9.163
  Bottom Layer w1.016: 22.504,13.868 23.241,14.605 ; 43.561,13.97 v1@43.739,14.148 ; 52.781,14.935 52.781,15.024
  other v1: 45.999,-0.991 46.761,-0.991 45.999,-0.152 46.761,-0.152 45.999,0.686 46.761,0.686 45.999,1.524 46.761,1.524 43.637,1.575 44.374,1.575 45.11,1.575 21.946,10.668 22.589,10.668 23.233,10.668 23.876,10.668 43.891,14.021 44.653,14.021 47.295,14.021 48.057,14.021 49.345,14.681 50.056,14.681 52.248,14.681 52.959,14.681 43.891,14.935 44.653,14.935 47.295,14.935 48.057,14.935 49.345,15.519 52.959,15.519 43.891,15.85 44.653,15.85 47.295,15.85 48.057,15.85 68.047,17.17 68.047,18.034 69.012,22.733 69.012,23.597
BOOT: J22.2 R9.1 U7.44 | length 31.1
  Top Layer w0.254: U7.44@50.991,29.684 51.024,29.651 51.024,28.732 v1(51.359,28.397) 51.75,28.006 51.75,27.762 ; v1@72.72,28.321 v1(72.72,28.397) 72.72,30.988 74.016,32.283 J22.2@77.013,32.283
  Bottom Layer w0.254: v1(51.359,28.397) v1(72.72,28.397)
BUCK_EN: C41.2 R11.2 R31.2 U2.1 U5.2 | length 37.7
  Top Layer w0.203: U5.2@8.85,10.332 9.681,10.332 9.881,10.133 9.881,9.398 10.389,8.89 R11.2@10.389,8.598
  Top Layer w0.254: v1(14.655,7.408) v1(14.655,7.408) R31.2@14.656,8.56 ; C41.2@41.275,8.238 C41.2@41.292,8.255
  Bottom Layer w0.254: v1(10.389,8.585) 11.565,7.408 v1(14.655,7.408) 23.106,7.408 26.451,10.754 33.518,10.754 37.643,6.629 v1(40.462,6.629)
BUTT1: C43.2 J5.1 R20.1 U7.19 | length 46
  Top Layer w0.254: v1@49.733,39.611 v1(49.733,39.675) ; R20.1@49.759,40.462 49.733,40.437 v1(49.733,39.675) ; U7.19@49.991,38.184 49.991,39.417 v1(49.733,39.675)
  Top Layer w0.305: J5.1@23.673,56.566 23.673,54.889 24.13,54.432 C43.2@24.968,54.432
  Bottom Layer w0.305: J5.1@23.673,56.566 23.673,44.094 27.432,40.335 49.073,40.335 v1(49.733,39.675)
BUTT2: C44.2 J6.1 R21.1 U7.20 | length 48.3
  Top Layer w0.254: R21.1@48.438,40.462 48.387,40.411 v1(48.387,39.649) 48.793,39.243 49.251,39.243 49.5,38.994 49.5,38.193 U7.20@49.491,38.184
  Top Layer w0.305: J6.1@18.034,56.566 18.034,54.889 18.491,54.432 C44.2@19.329,54.432
  Bottom Layer w0.305: J6.1@18.034,56.566 18.034,48.438 26.822,39.649 v1(48.387,39.649)
BUTT3: C45.2 J7.1 R22.1 U7.39 | length 64
  Top Layer w0.254: R22.1@46.558,27.381 46.558,28.016 47.219,28.677 48.315,28.677 48.491,28.853 U7.39@48.491,29.684 U7.39@48.491,29.684 48.49,32.887 48.489,32.888 v1(48.489,34.031)
  Top Layer w0.305: J7.1@12.395,56.566 12.395,54.889 12.852,54.432 C45.2@13.691,54.432
  Bottom Layer w0.305: J7.1@12.395,56.566 12.395,43.993 19.228,37.16 40.97,37.16 44.099,34.031 48.447,34.031 v1@48.468,34.011
BUTT4: C46.2 J8.1 R23.1 U7.40 | length 67
  Top Layer w0.254: R23.1@47.843,27.381 47.843,28.035 47.992,28.184 48.478,28.184 48.991,28.697 U7.40@48.991,29.684 48.994,29.687 48.994,32.865 v1(49.53,33.401)
  Top Layer w0.305: J8.1@6.756,56.566 J8.1@6.756,56.515 6.756,54.889 7.214,54.432 C46.2@8.052,54.432
  Bottom Layer w0.305: J8.1@6.756,56.515 6.756,48.811 18.89,36.678 40.77,36.678 44.047,33.401 v1(49.53,33.401)
BUTT5: C47.2 J9.1 R24.1 U7.41 | length 64.6
  Top Layer w0.254: R24.1@49.129,27.381 49.129,28.174 49.491,28.536 U7.41@49.491,29.684 49.491,30.619 v1(49.86,30.988)
  Top Layer w0.305: J9.1@0.025,48.844 1.702,48.844 2.134,48.412 C47.2@2.134,47.219
  Bottom Layer w0.305: J9.1@0.025,48.844 5.969,48.844 18.618,36.195 40.57,36.195 44.028,32.738 47.501,32.738 49.251,30.988 v1(49.86,30.988)
C\R\H\G\: LED1.2 U1.15 | length 25.3
  Top Layer w0.254: v1(46.152,21.311) 46.152,18.669 47.9,16.921 U1.15@49.481,16.921
  Top Layer w0.305: v1(58.674,23.343) 63.856,23.343 LED1.2@63.906,23.292
  Bottom Layer w0.254: v1(46.152,21.311) 48.184,23.343 v1(58.674,23.343)
CS_CELL: C5.2 U1.10 U1.13 | length 9.4
  Top Layer w0.254: v1(48.412,21.311) 48.412,18.517 48.7,18.229 49.473,18.229 U1.13@49.481,18.221 ; v1(51.232,21.311) C5.2@51.232,20.396 51.232,19.761 51.49,19.503 51.49,18.996 U1.10@51.515,18.971 ; v1@51.257,21.26 v1@51.257,21.361
  Bottom Layer w0.254: v1(48.412,21.311) v1(51.232,21.311)
GATE: Q1.1 U6.5 | length 10.4
  Top Layer w0.559: U6.5@32.345,9.398 v1(33.288,9.398)
  Top Layer w0.635: v1(33.288,1.713) Q1.1@35.022,1.713
  Bottom Layer w0.559: v1(33.288,1.713) v1(33.288,9.398)